# Altium PCB PCB1.PcbDoc (part 2 of 2)
Units mm, origin at the board's own origin, x right, y up, seen from the top; angles counter-clockwise.
Board outline 154.31 x 109.98 mm, 2 copper layers (Top Layer, Bottom Layer); 153 components, 126 nets, 468 pads, 76 vias.
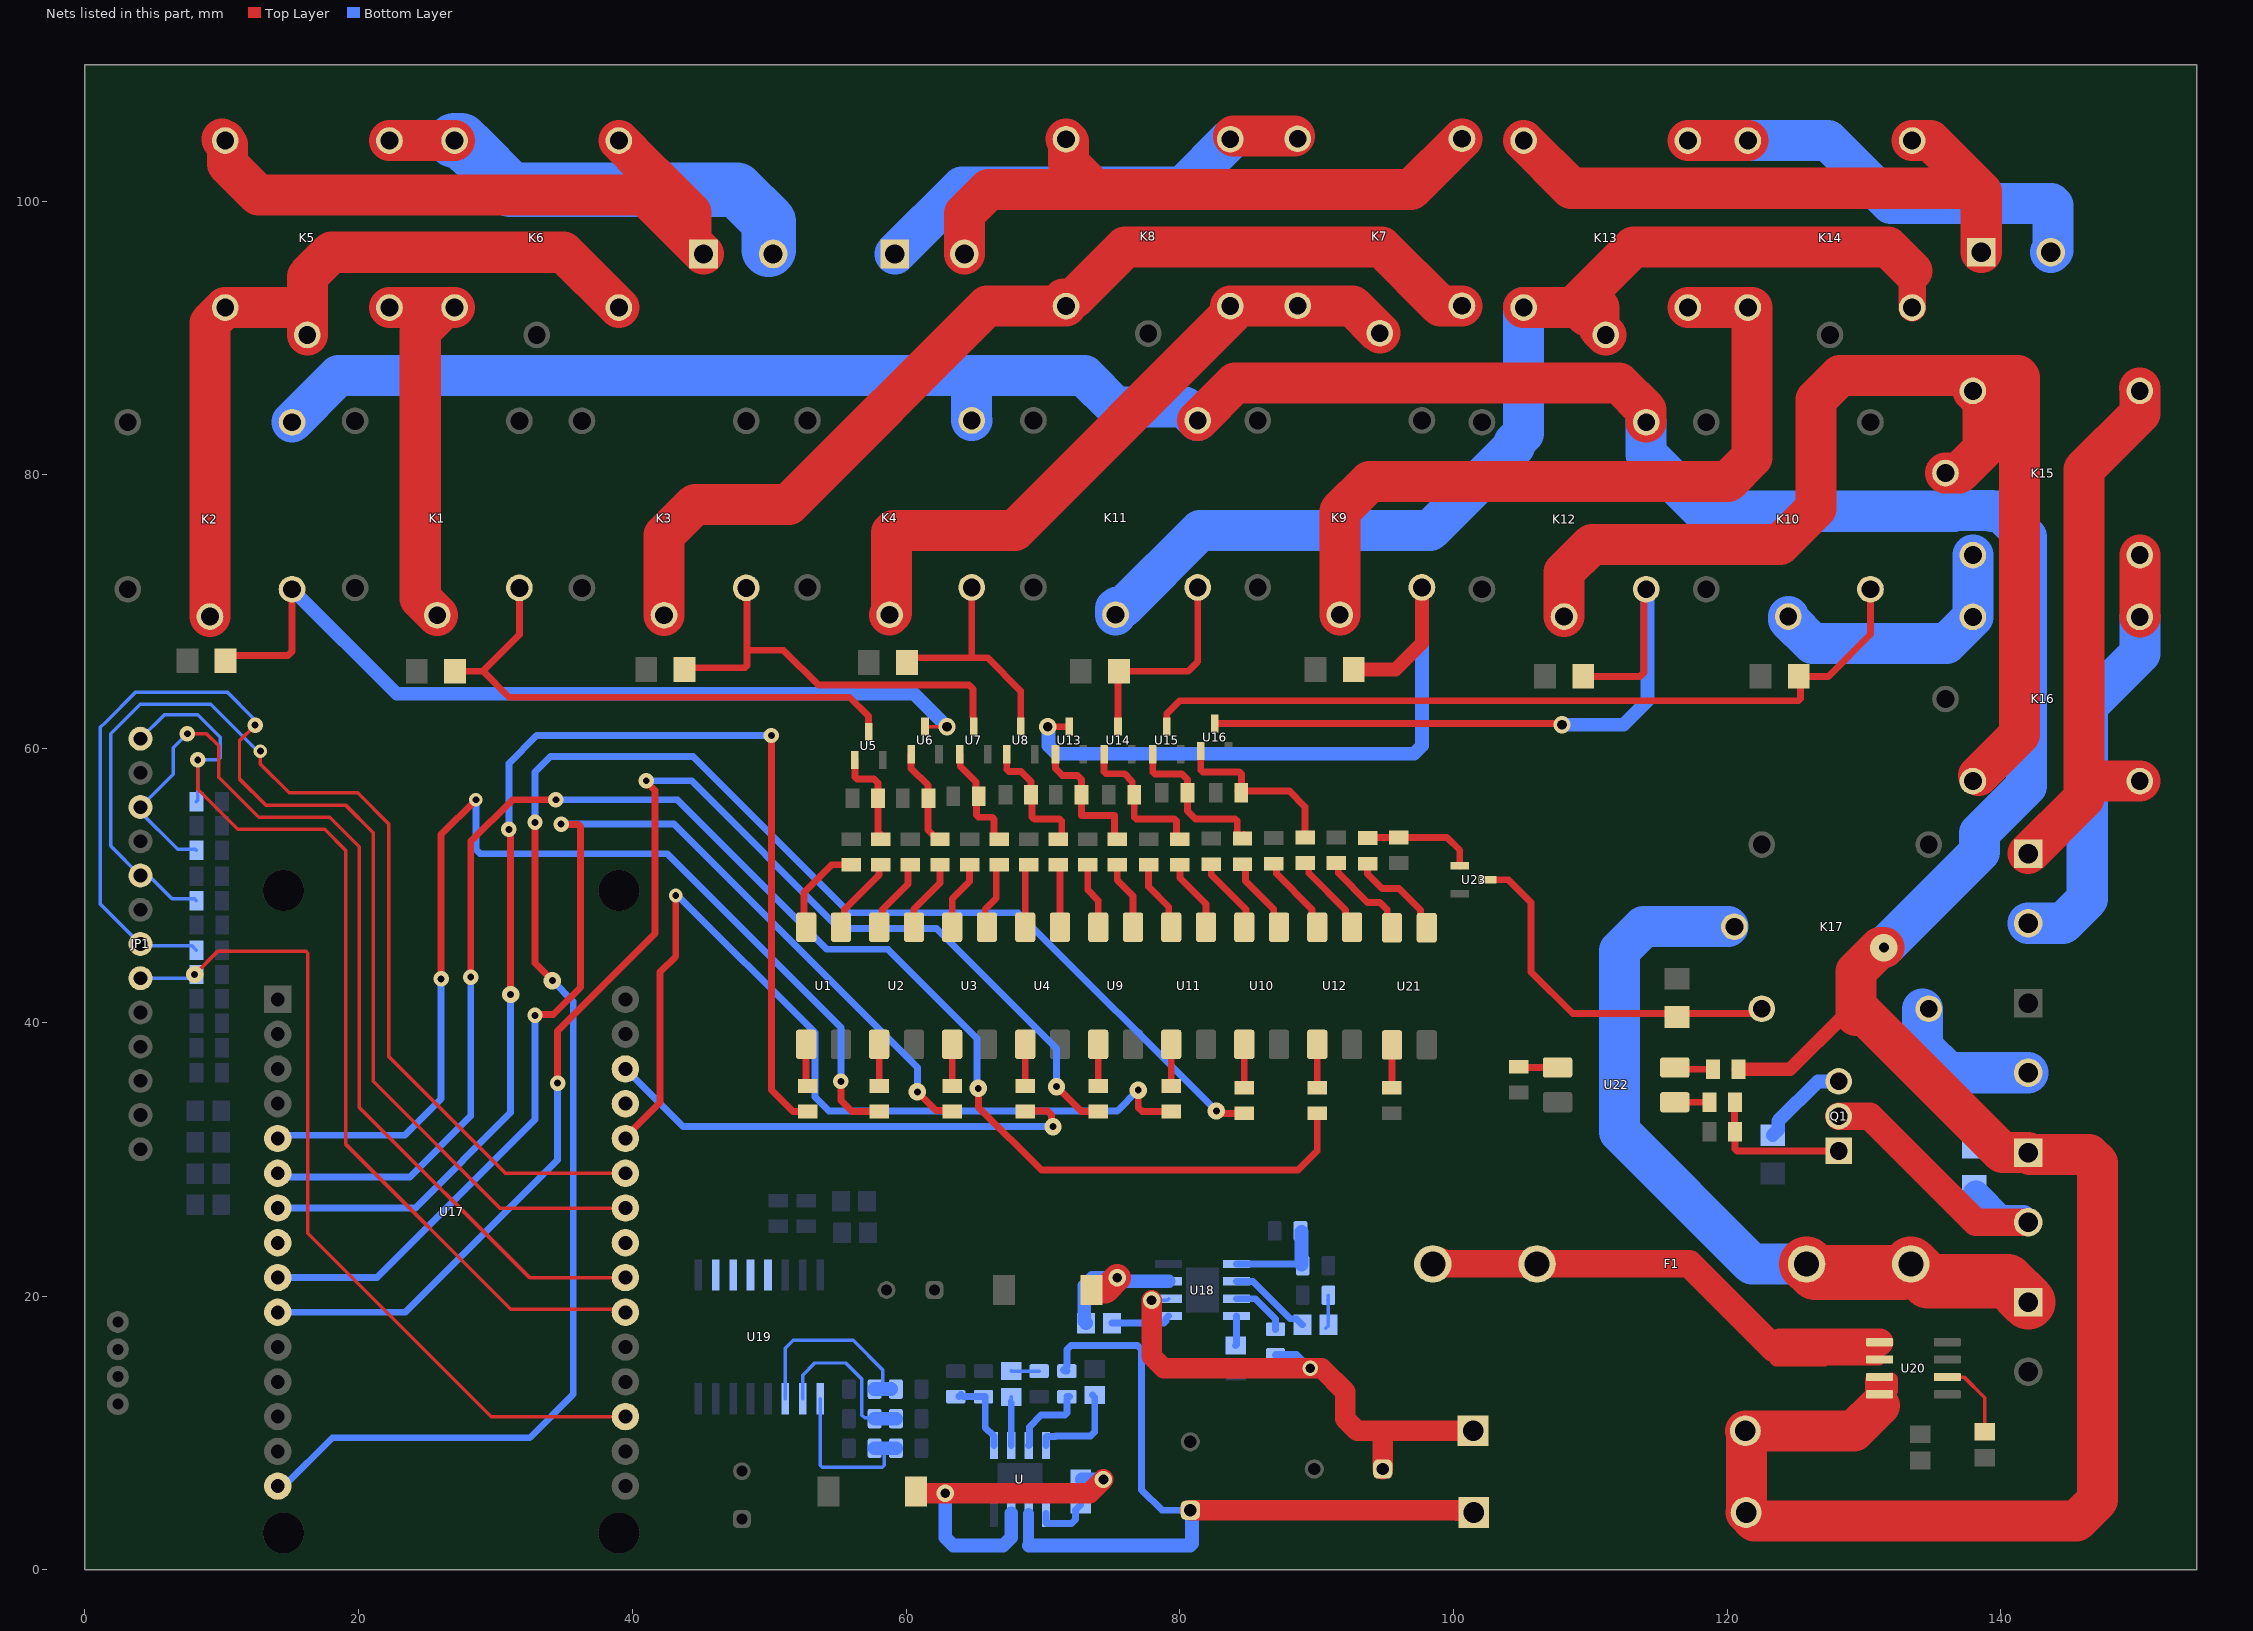
[diagram p2: the nets of this part, all layers, seen from the top]

## Via types
v1: diameter 1.127, hole 0.5, Top Layer to Bottom Layer, 26 vias
v2: diameter 1.27, hole 0.711, Top Layer to Bottom Layer, 22 vias
v3: diameter 1.27, hole 0.5, Top Layer to Bottom Layer, 10 vias
v4: diameter 1.127, hole 0.711, Top Layer to Bottom Layer, 7 vias
v5: diameter 1, hole 0.5, Top Layer to Bottom Layer, 6 vias
v6: diameter 5.711, hole 5.711, Top Layer to Bottom Layer, 4 vias
v7: diameter 2, hole 0.711, Top Layer to Bottom Layer, 1 vias

## Nets (pads, with @x,y where several pads share a name; then routed paths per layer and width w, separated by ;. In a path a pad name is that pad's centre, name@x,y a point inside that pad or via, vN(x,y) a via of type N, cw(c..) or ccw(c..) an arc to the next point about the centre after c; other vN are vias at no path point) (continued)
leftButtonPin4: JP1.6 R40.1 U17.18 | length 63.4
  Top Layer w0.254: JP1.6@4.064,42.926 JP1.6@4.064,43.227 4.492,43.227 JP1.6@4.572,43.307 ; v3(8.02,43.496) 9.736,45.212 16.143,45.212 16.292,45.063 16.292,24.602 29.697,11.197 39.137,11.197 39.243,11.303 39.349,11.197 U17.18@39.497,11.197
  Bottom Layer w0.254: JP1.6@4.064,43.227 7.886,43.227 R40.1@8.155,43.496
Net_2: ?.2 R46.2 U18.5 | length 7.3
  Bottom Layer w0.254: ?.2@88.819,24.765 ?.2@88.9,24.684 ; R46.2@88.9,22.306 R46.2@88.981,22.225
  Bottom Layer w0.5: U18.5@84.136,22.352 R46.2@88.789,22.352
  Bottom Layer w1: R46.2@88.9,22.306 ?.2@88.9,24.684
NetC1_1: C1.1 D1.C R45.2 U18.2 | length 38
  Top Layer w1.5: v2(77.944,19.693) 77.944,15.611 78.823,14.732 90.372,14.732 92.075,13.029 92.075,11.039 92.954,10.16 94.829,10.16 ; C1.1@94.829,7.366 94.829,10.16 ; D1.C@101.429,10.16 94.829,10.16
  Bottom Layer w0.254: v2(77.944,19.693) 79.067,19.693 U18.2@79.186,19.812
  Bottom Layer w0.5: R45.2@86.995,15.702 87.018,15.725 88.542,15.725 v4(89.535,14.732)
NetC2_1: C2.1 D2.C R47.2 U.2 | length 59.9
  Top Layer w1.5: C2.1@80.772,4.358 100.219,4.358 100.265,4.312 101.098,4.312 101.429,3.981 D2.C@101.429,3.81
  Bottom Layer w0.5: R47.2@71.755,14.524 71.582,14.524 71.501,14.605 71.587,14.691 71.755,14.859 71.755,16.09 72.048,16.383 76.923,16.383 77.216,16.09 77.216,5.842 78.7,4.358 C2.1@80.772,4.358
  Bottom Layer w0.8: 68.961,1.778 U.2@68.961,4.129
  Bottom Layer w1: 68.961,1.778 80.75,1.778 80.899,1.927 80.899,3.937 81.046,4.084 C2.1@80.772,4.358
NetC3_1: C3.1 L1.1 U18.3 | length 10.9
  Top Layer w2: L1.1@74.108,20.447 74.549,20.447 v2(75.438,21.336)
  Bottom Layer w1: C3.1@73.152,18.034 73.025,18.161 73.025,20.75 73.611,21.336 v2(75.438,21.336) ; v2@75.511,21.336 75.765,21.082 U18.3@79.186,21.082
NetC3_2: C3.2 U18.1 | length 4.5
  Bottom Layer w0.5: C3.2@75.052,18.034 78.845,18.034 78.994,18.183 78.994,18.369 79.167,18.542 U18.1@79.186,18.542
NetC4_1: C4.1 U18.8 | length 2.2
  Bottom Layer w0.5: C4.1@84.074,16.383 84.136,16.445 84.136,17.718 U18.8@84.136,18.542
NetC6_1: C6.1 U18.6 | length 6.1
  Bottom Layer w0.5: U18.6@84.136,21.082 84.145,21.073 85.353,21.073 88.084,18.342 88.531,18.342 C6.1@88.966,17.907
NetC6_2: C6.2 R49.2 | length 2.5
  Bottom Layer w0.254: C6.2@90.678,17.653 90.866,17.841 C6.2@90.866,17.907 90.851,17.922 90.851,19.639 90.805,19.685 90.851,19.731 R49.2@90.851,20.066
NetC7_1: C7.1 L2.1 U.3 | length 26
  Top Layer w1.5: L2.1@60.858,5.588 73.406,5.588 v2(74.422,6.604)
  Bottom Layer w0.254: C7.1@72.771,6.665 C7.1@72.832,6.604
  Bottom Layer w1: v2(62.865,5.588) 62.865,2.364 63.451,1.778 67.105,1.778 67.691,2.364 U.3@67.691,4.129 ; C7.1@72.832,6.604 v2(74.422,6.604)
NetC7_2: C7.2 U.1 | length 4.2
  Bottom Layer w0.5: U.1@70.231,4.129 70.231,3.444 70.281,3.394 72.096,3.394 72.388,3.687 72.388,4.382 C7.2@72.771,4.765
NetC8_1: C8.1 U.8 | length 7.1
  Bottom Layer w0.5: U.8@70.231,9.079 70.231,9.702 70.281,9.752 70.904,9.752 70.931,9.779 73.494,9.779 73.787,10.072 73.787,12.612 C8.1@73.633,12.766
NetC10_1: C10.1 U.6 | length 3.7
  Bottom Layer w0.254: C10.1@67.691,12.192 67.564,12.319 67.691,12.446 C10.1@67.691,12.639
  Bottom Layer w0.5: U.6@67.691,9.079 C10.1@67.691,12.192
NetC10_2: C10.2 R51.2 | length 2
  Bottom Layer w0.254: C10.2@67.691,14.539 67.706,14.524 R51.2@69.723,14.524
NetC12_1: C12.1 U20.6 | length 5.8
  Top Layer w0.254: U20.6@136.079,14.097 136.088,14.088 137.296,14.088 138.811,12.573 C12.1@138.811,10.094
NetJ1_1: J1.1 K1.A2 U5.3 | length 39.9
  Top Layer w0.5: J1.1@27.054,65.659 29.083,65.659 ; K1.A2@31.75,71.747 31.75,68.326 29.083,65.659 ; U5.3@57.248,61.243 57.248,62.386 55.88,63.754 30.988,63.754 29.083,65.659
NetJ2_1: J2.1 K2.A2 U6.3 | length 63.6
  Top Layer w0.254: U6.3@61.392,61.622 61.418,61.595 62.523,61.595 62.611,61.683 62.611,61.849 62.865,61.595 v2(62.992,61.595)
  Top Layer w0.5: J2.1@10.29,66.421 10.671,66.802 14.851,66.802 15.144,67.095 K2.A2@15.144,71.651
  Bottom Layer w1: K2.A2@15.144,71.651 22.787,64.008 60.579,64.008 v2(62.992,61.595)
NetJ3_1: J3.1 K3.A2 U7.3 | length 30.1
  Top Layer w0.5: J3.1@43.818,65.786 44.196,65.786 44.323,65.913 48.238,65.913 48.387,66.062 48.387,67.183 ; K3.A2@48.322,71.747 48.387,71.682 48.387,67.183 ; 64.897,62.325 64.897,64.35 64.604,64.643 53.594,64.643 51.054,67.183 48.387,67.183
NetJ4_1: J4.1 K4.A2 U8.3 | length 17.3
  Top Layer w0.5: J4.1@60.074,66.294 60.424,66.644 64.801,66.644 ; K4.A2@64.801,71.778 64.874,71.778 64.897,71.755 64.801,71.659 64.801,66.644 ; U8.3@68.377,61.622 68.377,64.223 65.956,66.644 64.801,66.644
NetJ5_1: J5.1 K5.NC K6.NO | length 49.2
  Top Layer w3: K5.NC@10.033,104.521 K5.NC@10.129,104.425 ; K5.NC@10.256,104.425 K5.NC@10.129,104.425 ; K6.NO@39.02,104.425 40.941,102.504 41.941,101.504 44.292,99.153 J5.1@44.292,97.059 ; J5.1@45.212,96.139 J5.1@44.292,97.059 ; K5.NC@10.129,104.425 10.414,104.14 10.414,102.722 12.679,100.457 40.894,100.457 43.245,98.106 J5.1@44.292,97.059
NetJ5_2: J5.2 K5.NO K6.NC | length 32.2
  Top Layer w3: K5.NO@22.256,104.425 K6.NC@27.02,104.425
  Bottom Layer w4: K6.NC@27.02,104.425 27.479,104.425 28.018,103.886 28.067,103.886 31.115,100.838 47.635,100.838 49.979,98.495 J5.2@49.979,96.452
NetJ6_1: J6.1 K7.NC K8.NO | length 33.1
  Top Layer w0.254: K8.NO@83.693,104.529 K8.NO@83.939,104.775 ; K7.NC@88.392,104.775 K7.NC@88.615,104.552
  Top Layer w3: K8.NO@83.939,104.775 K7.NC@88.392,104.775
  Bottom Layer w3: J6.1@59.182,96.139 64.087,101.044 80.208,101.044 K8.NO@83.693,104.529
NetJ6_2: J6.2 K7.NO K8.NC | length 46.1
  Top Layer w3: J6.2@64.262,96.139 64.262,99.081 66.019,100.838 73.809,100.838 ; K8.NC@71.693,104.529 71.882,104.34 71.882,102.765 73.809,100.838 ; K7.NO@100.615,104.552 96.901,100.838 73.809,100.838
NetJ7_1: J7.1 K9.A2 U13.3 | length 52.2
  Top Layer w0.5: v2(70.358,61.595) 71.906,61.595 U13.3@71.933,61.622
  Top Layer w1: J7.1@92.713,65.786 95.758,65.786 97.694,67.722 K9.A2@97.694,71.778
  Bottom Layer w1: v2(70.358,61.595) 70.41,61.543 70.41,60.213 70.995,59.628 97.108,59.628 97.694,60.213 K9.A2@97.694,71.778
NetJ8_1: J8.1 K11.A2 U14.3 | length 15.8
  Top Layer w0.5: U14.3@75.489,61.622 75.489,64.886 76.008,65.405 76.073,65.405 76.076,65.408 J8.1@76.076,65.659 ; J8.1@75.568,65.659 J8.1@76.076,65.659 ; K11.A2@81.311,71.778 81.311,66.347 80.623,65.659 J8.1@76.076,65.659
NetJ9_1: J9.1 K10.A2 U15.3 | length 59
  Top Layer w0.5: U15.3@79.045,61.622 79.045,62.535 80.01,63.5 125.2,63.5 125.349,63.649 125.349,65.154 J9.1@125.225,65.278 ; J9.1@125.349,65.278 127.381,65.278 130.46,68.357 K10.A2@130.46,71.651
NetJ10_1: J10.1 K12.A2 U16.3 | length 51.3
  Top Layer w0.254: v2@107.828,61.849 v2(107.926,61.751)
  Top Layer w0.5: U16.3@82.55,61.849 v2@107.828,61.849 ; J10.1@109.477,65.278 113.626,65.278 113.919,65.571 113.919,71.493 K12.A2@114.077,71.651
  Bottom Layer w1: v2(107.926,61.751) 112.424,61.751 114.173,63.5 114.173,71.555 K12.A2@114.077,71.651
NetJ11_1: J11.1 K13.NC K14.NO | length 45.4
  Top Layer w3: K13.NC@105.125,104.425 108.605,100.945 138.323,100.945 134.843,104.425 K14.NO@133.508,104.425 ; 138.535,100.733 138.557,100.711 J11.1@138.557,96.266
NetJ11_2: J11.2 K13.NO K14.NC | length 32.1
  Top Layer w3: K13.NO@117.125,104.425 K14.NC@121.508,104.425
  Bottom Layer w3: K14.NC@121.508,104.425 127.35,104.425 131.953,99.822 143.637,99.822 143.786,99.673 143.786,96.415 J11.2@143.637,96.266
NetJ12_1: J12.1 K15.NC K16.NO | length 41.1
  Top Layer w3: J12.1@141.986,52.324 145.838,56.176 ; 146.05,56.388 146.05,80.391 150.145,84.486 K15.NC@150.145,86.137 150.145,86.329 K15.NC@150.114,86.36 ; 146.35,58.12 146.843,57.627 K16.NO@150.145,57.627
NetJ12_2: J12.2 K15.NO K16.NC | length 31.8
  Top Layer w3: K16.NC@150.145,69.627 K15.NO@150.145,74.137
  Bottom Layer w3: J12.2@141.986,47.244 144.547,47.244 146.304,49.001 146.304,63.119 150.145,66.96 K16.NC@150.145,69.627
NetJ13_2: J13.2 Q1.3 | length 6.8
  Bottom Layer w1: J13.2@123.317,31.753 123.717,32.153 123.717,32.785 126.619,35.687 Q1.3@128.143,35.687
NetJ14_1: J14.1 K17.A2 U23.3 | length 27.3
  Top Layer w0.5: U23.3@102.489,50.419 104.013,50.419 105.664,48.768 105.664,43.688 108.712,40.64 J14.1@116.332,40.64 ; J14.1@116.332,40.386 116.586,40.64 121.781,40.64 122.131,40.99 K17.A2@122.523,40.99
NetJ15_1: J15.1 J16.2 Q1.2 | length 21.7
  Top Layer w2: Q1.2@128.143,33.147 130.4,33.147 138.147,25.4 J16.2@141.986,25.4
  Bottom Layer w2: J15.1@138.176,27.432 139.954,25.654 141.605,25.654 141.84,25.419 141.967,25.419 J16.2@141.986,25.4
NetJ17_2: J17.2 K17.NO | length 11.3
  Bottom Layer w3: K17.NO@134.27,40.99 134.27,38.196 136.144,36.322 J17.2@141.986,36.322
NetK1_COM: K1.COM K5.A2 K6.A1 | length 29.2
  Top Layer w3: K5.A2@22.256,92.225 25.723,92.225 K6.A1@27.02,92.225 26.268,92.225 24.511,90.468 24.511,70.986 K1.COM@25.75,69.747
NetK2_COM: K2.COM K5.A1 K5.COM K6.A2 | length 58.5
  Top Layer w3: K2.COM@9.144,69.651 9.144,91.113 K5.A1@10.256,92.225 16.256,92.225 ; K5.COM@16.256,90.225 16.256,92.225 ; K6.A2@39.02,92.225 34.979,96.266 18.013,96.266 16.256,94.509 16.256,92.225
NetK3_COM: K3.COM K7.A2 K8.A1 | length 75.2
  Top Layer w3: K3.COM@42.322,69.747 42.322,75.596 44.577,77.851 51.435,77.851 65.913,92.329 K8.A1@71.693,92.329 71.501,92.521 71.501,92.837 72.201,92.837 76.011,96.647 94.742,96.647 99.037,92.352 K7.A2@100.615,92.352
NetK4_COM: K4.COM K7.A1 K7.COM K8.A2 | length 49.8
  Top Layer w3: K4.COM@58.801,69.778 58.928,69.905 58.928,75.797 59.077,75.946 67.945,75.946 83.693,91.694 K8.A2@83.693,92.329 88.592,92.329 K7.A1@88.615,92.352 92.615,92.352 K7.COM@94.615,90.352
NetK9_COM: K9.COM K13.A2 K14.A1 | length 54.6
  Top Layer w3: K9.COM@91.694,69.778 91.694,77.343 93.853,79.502 120.036,79.502 121.793,81.259 K14.A1@121.793,92.225 ; K13.A2@117.125,92.225 K14.A1@121.508,92.225
NetK10_COM: K10.COM K15.A2 K16.A1 | length 19.7
  Bottom Layer w3: K10.COM@124.46,69.651 124.46,69.448 126.217,67.691 136.009,67.691 K16.A1@137.945,69.627 K15.A2@137.945,74.137
NetK11_COM: K11.COM K13.A1 K13.COM K14.A2 | length 82
  Top Layer w2: K14.A2@133.508,92.225 133.508,94.89
  Top Layer w3: K13.A1@105.125,92.225 109.125,92.225 109.756,91.595 ; 108.735,92.225 113.157,96.647 131.751,96.647 133.508,94.89 ; 110.617,92.225 110.617,90.733 K13.COM@111.125,90.225
  Bottom Layer w3: K11.COM@75.311,69.778 75.311,70.231 75.438,70.358 75.464,70.332 75.865,70.332 81.479,75.946 98.298,75.946 104.439,82.087 104.439,82.354 105.125,83.04 K13.A1@105.125,92.225
NetK12_COM: K12.COM K15.A1 K15.COM K16.A2 | length 86.2
  Top Layer w0.254: K16.A2@137.945,57.627 137.945,57.808 138.176,58.039 K16.A2@138.357,58.039 ; 141.224,87.249 141.351,87.122
  Top Layer w3: K12.COM@108.077,69.651 108.077,72.898 110.109,74.93 123.846,74.93 126.479,77.563 126.479,85.492 128.236,87.249 138.049,87.249 141.224,87.249 ; K15.COM@135.945,80.137 136.945,80.137 138.702,81.894 138.702,85.38 K15.A1@137.945,86.137 ; K16.A2@138.357,58.039 141.351,61.033 141.351,87.122
NetLabel22: U17.8 | length 0.4
  Top Layer w0.254: U17.8@14.097,23.897 14.097,24.13 U17.8@14.224,24.257
NetLabel23: U17.27
NetLabel36: U17.23
NetLabel51: U19.13
NetLabel52: U19.12
NetLabel53: U19.11
NetLabel54: U19.10
NetQ1_1: Q1.1 R59.2 R61.2 | length 11.1
  Top Layer w0.5: R59.2@120.569,34.163 120.523,34.117 120.523,32.512 120.569,32.466 120.569,30.756 120.718,30.607 Q1.1@128.143,30.607
NetR1_2: R1.2 U2.1 | length 3
  Top Layer w0.5: R1.2@58.039,35.352 U2.1@58.039,38.392
NetR2_2: R2.2 U1.1 | length 3.1
  Top Layer w0.254: R2.2@52.705,35.433 52.786,35.352 R2.2@52.832,35.352
  Top Layer w0.5: R2.2@52.705,35.433 U1.1@52.705,38.392
NetR3_2: R3.2 U4.1 | length 3
  Top Layer w0.5: R3.2@68.707,35.352 U4.1@68.707,38.392
NetR4_2: R4.2 U3.1 | length 3
  Top Layer w0.5: R4.2@63.373,35.352 U3.1@63.373,38.392
NetR5_2: R5.2 R9.2 U5.1 | length 7.4
  Top Layer w0.5: U5.1@56.261,59.182 56.261,57.934 56.41,57.785 57.658,57.785 57.958,57.485 R5.2@57.958,56.388 57.958,53.759 57.996,53.721 58.166,53.721 R9.2@58.166,53.386
NetR6_1: R6.1 U1.4 | length 6.9
  Top Layer w0.5: U1.4@52.705,46.952 52.548,47.109 52.548,49.5 54.564,51.516 R6.1@56.007,51.516
NetR7_1: R7.1 U2.4 | length 5.5
  Top Layer w0.5: U2.4@58.039,46.952 58.292,47.205 58.292,48.259 60.155,50.122 60.155,51.346 R7.1@60.325,51.516
NetR8_1: R8.1 U2.3 | length 5.4
  Top Layer w0.5: U2.3@60.579,46.952 60.579,48.278 62.484,50.183 R8.1@62.484,51.516
NetR8_2: R8.2 R15.2 U6.1 | length 7.2
  Top Layer w0.5: U6.1@60.376,59.59 60.376,58.556 61.602,57.33 61.602,56.388 61.602,54.058 62.274,53.386 R8.2@62.484,53.386
NetR9_1: R9.1 U1.3 | length 5.8
  Top Layer w0.5: U1.3@55.245,46.952 55.498,47.205 55.498,48.259 58.023,50.784 58.023,51.373 R9.1@58.166,51.516
NetR10_1: R10.1 U3.4 | length 5.1
  Top Layer w0.5: U3.4@63.373,46.952 63.373,49.022 64.643,50.292 R10.1@64.643,51.516
NetR11_2: R11.2 R14.2 U7.1 | length 8.1
  Top Layer w0.5: U7.1@63.932,59.59 63.961,59.56 63.961,58.721 65.11,57.572 65.11,56.729 R11.2@65.324,56.515 65.151,56.342 65.151,55.14 65.3,54.991 66.272,54.991 66.421,54.842 66.421,53.721 66.756,53.386 R14.2@66.802,53.386
NetR12_1: R12.1 U4.4 | length 5.1
  Top Layer w0.254: R12.1@68.707,51.143 68.999,51.435 69.215,51.435 69.134,51.516 R12.1@68.961,51.516
  Top Layer w0.5: U4.4@68.707,46.952 R12.1@68.707,51.143
NetR13_1: R13.1 U4.3 | length 4.8
  Top Layer w0.5: R13.1@71.12,51.516 71.247,51.389 71.247,47.752 71.501,47.498 71.247,47.244 U4.3@71.247,46.952
NetR13_2: R13.2 R16.2 U8.1 | length 10
  Top Layer w0.5: U8.1@67.361,59.59 67.361,58.471 67.51,58.322 68.4,58.322 69.134,57.588 R16.2@69.134,56.642 69.215,56.561 69.215,55.013 69.364,54.864 71.225,54.864 71.374,54.715 71.374,53.213 71.201,53.386 R13.2@71.12,53.386
NetR14_1: R14.1 U3.3 | length 5
  Top Layer w0.5: U3.3@65.913,46.952 65.786,47.079 65.786,48.26 66.592,49.066 66.592,51.306 R14.1@66.802,51.516
NetR17_2: R17.2 U11.1 | length 3.2
  Top Layer w0.254: R17.2@79.375,35.687 79.629,35.433 R17.2@79.548,35.352
  Top Layer w0.5: R17.2@79.375,35.687 U11.1@79.375,38.392
NetR18_2: R18.2 U12.1 | length 3.2
  Top Layer w0.5: R18.2@90.043,35.225 U12.1@90.043,38.392
NetR19_2: R19.2 U9.1 | length 3.4
  Top Layer w0.254: U9.1@74.041,38.1 73.787,38.354 73.825,38.392 U9.1@74.041,38.392
  Top Layer w0.5: R19.2@74.041,35.352 U9.1@74.041,38.1
NetR20_2: R20.2 U10.1 | length 3.2
  Top Layer w0.5: R20.2@84.709,35.225 U10.1@84.709,38.392
NetR21_2: R21.2 R29.2 U13.1 | length 10.1
  Top Layer w0.5: U13.1@70.917,59.59 70.917,58.542 71.42,58.039 72.517,58.039 72.817,57.739 72.817,55.118 75.228,55.118 75.228,53.596 R29.2@75.438,53.386
NetR22_2: R22.2 R30.2 U15.1 | length 12.3
  Top Layer w0.5: U15.1@78.029,59.59 78.029,58.289 78.178,58.14 80.163,58.14 80.564,57.739 80.564,55.453 81.153,54.864 84.052,54.864 84.201,54.715 84.201,53.467 84.236,53.432 R30.2@84.582,53.432 84.582,53.594 R30.2@84.709,53.721
NetR23_1: R23.1 U9.4 | length 5
  Top Layer w0.5: R23.1@73.279,51.516 73.279,49.657 74.041,48.895 74.041,47.498 74.168,47.371 74.041,47.244 U9.4@74.041,46.952
NetR24_1: R24.1 U10.4 | length 5.7
  Top Layer w0.5: R24.1@82.296,51.562 82.296,50.8 84.837,48.259 84.837,47.08 U10.4@84.709,46.952
NetR25_1: R25.1 U11.4 | length 5.2
  Top Layer w0.5: R25.1@77.724,51.516 77.724,49.911 79.195,48.44 79.195,47.132 U11.4@79.375,46.952
NetR26_1: R26.1 U11.3 | length 5.4
  Top Layer w0.5: R26.1@80.01,51.516 80.01,50.546 81.915,48.641 U11.3@81.915,46.952
NetR26_2: R26.2 R31.2 U14.1 | length 10.9
  Top Layer w0.5: U14.1@74.473,59.59 74.473,58.315 74.622,58.166 75.946,58.166 76.528,57.584 76.528,56.787 R31.2@76.673,56.642 76.673,55.013 76.822,54.864 79.607,54.864 79.756,54.715 79.756,53.64 R26.2@80.01,53.386
NetR27_1: R27.1 U12.4 | length 6
  Top Layer w0.5: R27.1@86.868,51.597 87.057,51.408 87.057,50.865 89.663,48.259 89.663,47.332 U12.4@90.043,46.952
NetR28_1: R28.1 U12.3 | length 6.1
  Top Layer w0.5: R28.1@89.154,51.643 89.424,51.373 89.424,50.911 92.114,48.221 92.114,47.421 U12.3@92.583,46.952
NetR28_2: R28.2 R32.2 U16.1 | length 13.5
  Top Layer w0.5: U16.1@81.534,59.817 81.534,58.442 81.683,58.293 84.352,58.293 84.501,58.144 R32.2@84.501,56.896 ; R32.2@84.252,56.896 84.379,56.769 R32.2@84.501,56.769 R32.2@84.501,56.896 ; R28.2@89.154,53.513 89.154,55.753 88.011,56.896 R32.2@84.501,56.896
NetR29_1: R29.1 U9.3 | length 5
  Top Layer w0.5: R29.1@75.438,51.516 75.438,50.382 76.581,49.239 U9.3@76.581,46.952
NetR30_1: R30.1 U10.3 | length 5.7
  Top Layer w0.5: R30.1@84.582,51.562 84.792,51.352 84.792,50.336 86.869,48.259 86.869,47.332 U10.3@87.249,46.952
NetR45_1: R45.1 U18.7 | length 4.2
  Bottom Layer w0.5: U18.7@84.136,19.812 85.51,19.812 86.995,18.327 R45.1@86.995,17.572
NetR47_1: R47.1 U.7 | length 6
  Bottom Layer w0.5: U.7@68.961,9.079 69.014,9.132 69.014,10.445 69.872,11.303 71.606,11.303 71.755,11.452 71.755,12.446 71.963,12.654 R47.1@71.755,12.654
NetR48_2: R48.2 R50.2 U.5 | length 5.9
  Bottom Layer w0.5: R48.2@63.881,12.654 63.881,12.7 64.008,12.827 64.181,12.654 65.786,12.654 65.786,10.399 66.421,9.764 U.5@66.421,9.079
NetR54_2: R54.2 U21.1 | length 3.2
  Top Layer w0.254: R54.2@95.504,35.352 R54.2@95.631,35.225
  Top Layer w0.5: R54.2@95.504,35.352 U21.1@95.504,38.354
NetR55_2: R55.2 U22.1 | length 2.9
  Top Layer w0.254: R55.2@104.521,36.703 104.567,36.749 R55.2@104.775,36.749 ; R55.2@105.156,36.495 R55.2@105.156,36.703
  Top Layer w0.5: R55.2@105.156,36.703 U22.1@107.607,36.703
NetR56_1: R56.1 U21.4 | length 6.9
  Top Layer w0.5: R56.1@91.44,51.643 91.583,51.5 91.583,50.911 93.726,48.768 94.615,48.768 95.162,48.221 95.162,47.256 U21.4@95.504,46.914
NetR57_1: R57.1 U21.3 | length 7.2
  Top Layer w0.5: R57.1@93.726,51.597 93.726,50.847 94.789,49.784 96.012,49.784 97.594,48.202 97.594,47.364 U21.3@98.044,46.914
NetR57_2: R57.2 R60.2 U23.1 | length 8.3
  Top Layer w0.5: R57.2@93.726,53.467 93.772,53.513 R60.2@96.012,53.513 99.522,53.513 100.457,52.578 U23.1@100.457,51.435
NetR58_1: R58.1 U22.4 | length 2.8
  Top Layer w0.254: U22.4@116.167,36.703 U22.4@116.294,36.576
  Top Layer w0.5: U22.4@116.294,36.576 R58.1@118.953,36.576
NetR59_1: R59.1 U22.3 | length 2.5
  Top Layer w0.5: U22.3@116.167,34.163 R59.1@118.699,34.163
NetR62_1: R62.1 R63.2 U19.1 | length 12.5
  Bottom Layer w0.254: U19.1@53.721,12.497 53.721,7.642 53.87,7.493 58.271,7.493 58.42,7.642 58.42,8.763 58.547,8.89
  Bottom Layer w1: R63.2@57.704,8.89 58.547,8.89 R62.1@59.263,8.89
NetR64_1: R64.1 R65.2 U19.2 | length 12.1
  Bottom Layer w0.254: U19.2@52.451,12.497 52.451,14.224 53.34,15.113 55.605,15.113 56.769,13.949 56.769,11.303 56.972,11.1 57.653,11.1 R65.2@57.704,11.049
  Bottom Layer w1: R65.2@57.704,11.049 R64.1@59.263,11.049
NetR66_1: R66.1 R67.2 U19.3 | length 15.2
  Bottom Layer w0.254: U19.3@51.181,12.497 51.181,16.189 51.756,16.764 56.134,16.764 58.293,14.605 58.293,13.208 ; R67.2@57.704,13.035 R67.2@57.704,13.208 ; R66.1@58.928,13.208 59.055,13.081 59.182,13.208 R66.1@59.263,13.208
  Bottom Layer w1: R67.2@57.704,13.208 58.293,13.208 R66.1@58.928,13.208
rightButtonPin1: JP1.13 R33.1 U17.21 | length 75.9
  Top Layer w0.254: JP1.13@3.937,60.452 4.064,60.579 JP1.13@4.064,60.727 JP1.13@4.244,60.727 ; v1(8.255,59.182) 8.255,57.023 11.176,54.102 17.526,54.102 19.05,52.578 19.05,31.115 31.115,19.05 39.264,19.05 U17.21@39.497,18.817
  Bottom Layer w0.254: JP1.13@4.064,60.727 5.821,62.484 8.255,62.484 9.906,60.833 9.906,59.331 9.757,59.182 v1(8.255,59.182) 8.255,56.234 R33.1@8.155,56.134
rightButtonPin2: JP1.11 R35.1 U17.22 | length 73.8
  Top Layer w0.254: JP1.11@4.064,56.007 JP1.11@4.064,55.727 4.09,55.727 JP1.11@4.204,55.613 ; v1(7.493,61.087) 8.89,61.087 9.779,60.198 9.779,57.912 12.7,54.991 17.907,54.991 20.066,52.832 20.066,33.782 32.491,21.357 U17.22@39.497,21.357
  Bottom Layer w0.254: v1(7.493,61.087) 6.477,60.071 6.477,58.14 JP1.11@4.064,55.727 4.064,55.372 6.788,52.648 8.085,52.648 R35.1@8.155,52.578
rightButtonPin3: JP1.9 R37.1 U17.25 | length 79.4
  Top Layer w0.254: JP1.9@4.064,50.727 4.245,50.727 JP1.9@4.445,50.927 ; v5(12.827,59.817) 12.827,58.876 14.934,56.769 19.939,56.769 22.225,54.483 22.225,37.487 30.735,28.977 U17.25@39.497,28.977
  Bottom Layer w0.254: JP1.9@4.064,50.727 1.905,52.886 1.905,61.087 4.064,63.246 9.196,63.246 12.625,59.817 v5(12.827,59.817) ; JP1.9@4.35,50.441 4.961,50.441 6.372,49.03 8.02,49.03 R37.1@8.155,48.895
rightButtonPin4: JP1.7 R39.1 U17.24 | length 91.8
  Top Layer w0.254: JP1.7@4.064,45.727 4.071,45.727 JP1.7@4.258,45.914 ; v1(12.446,61.722) 11.303,60.579 11.303,57.785 13.208,55.88 19.05,55.88 21.082,53.848 21.082,35.687 30.332,26.437 U17.24@39.497,26.437
  Bottom Layer w0.254: R39.1@8.155,45.274 7.836,45.593 4.755,45.593 4.445,45.903 4.445,46.101 4.071,45.727 JP1.7@4.064,45.727 1.143,48.648 1.143,61.551 1.524,61.932 3.727,64.135 10.414,64.135 12.279,62.27 12.279,61.889 v1(12.446,61.722)
stopRelayPin1: R1.1 U17.5 | length 80.2
  Top Layer w0.5: v1(26.035,43.18) 26.035,53.721 v5(28.575,56.261) ; v1(55.245,35.687) 55.245,34.29 56.053,33.482 R1.1@58.039,33.482
  Bottom Layer w0.5: U17.5@14.097,31.517 14.33,31.75 23.368,31.75 26.035,34.417 v1(26.035,43.18) ; v5(28.575,56.261) 28.575,52.617 28.868,52.324 42.545,52.324 55.245,39.624 v1(55.245,35.687)
stopRelayPin2: R3.1 U17.28 | length 36
  Top Layer w0.254: R3.1@68.661,33.528 R3.1@68.707,33.482
  Top Layer w0.5: R3.1@68.661,33.528 70.338,33.528 70.63,33.235 70.63,32.494 v3(70.739,32.385)
  Bottom Layer w0.5: U17.28@39.497,36.597 43.709,32.385 v3(70.739,32.385)
stopRelayPin3: R17.1 U17.26 | length 66.8
  Top Layer w0.5: U17.26@39.497,31.517 39.497,31.623 42.037,34.163 42.037,43.688 43.18,44.831 v5(43.18,49.276) ; v3(76.962,35.052) 76.962,33.782 77.262,33.482 R17.1@79.375,33.482
  Bottom Layer w0.5: v5(43.18,49.276) 43.307,49.276 53.34,39.243 53.34,34.544 54.356,33.528 75.438,33.528 v3(76.962,35.052)
stopRelayPin4: R18.1 U17.6 | length 116.8
  Top Layer w0.5: v1(28.194,43.307) 28.194,53.213 31.242,56.261 v1(34.417,56.261) ; v3(65.278,35.179) 65.306,35.151 65.306,33.794 69.89,29.21 88.646,29.21 90.043,30.607 90.043,33.274 89.962,33.355 R18.1@90.043,33.355
  Bottom Layer w0.5: U17.6@14.097,28.977 14.372,28.702 23.749,28.702 28.194,33.147 v1(28.194,43.307) ; v1(34.417,56.261) 43.307,56.261 54.229,45.339 58.674,45.339 65.195,38.818 65.195,35.262 v3(65.278,35.179)
transistorPin1: R2.1 U17.7 | length 94.7
  Top Layer w0.254: v1(30.988,54.102) v1@31.115,53.975
  Top Layer w0.5: v3(31.115,42.037) v1@31.115,53.975 ; v1(50.165,60.96) 50.165,35.052 51.735,33.482 R2.1@52.832,33.482
  Bottom Layer w0.5: U17.7@14.097,26.437 24.151,26.437 31.115,33.401 v3(31.115,42.037) ; v1(30.988,54.102) 30.988,58.928 33.02,60.96 v1(50.165,60.96)
transistorPin2: R4.1 U17.9 | length 86.7
  Top Layer w0.5: v1(32.893,40.513) 32.956,40.576 34.227,40.576 36.215,42.565 36.215,54.314 36.066,54.463 34.818,54.463 v1(34.798,54.483) ; v3@60.98,34.778 62.206,33.552 63.303,33.552 R4.1@63.373,33.482
  Bottom Layer w0.5: U17.9@14.097,21.357 21.357,21.357 32.893,32.893 v1(32.893,40.513) ; v1(34.798,54.483) 43.053,54.483 60.833,36.703 v3(60.833,34.925)
transistorPin3: R19.1 U17.10 | length 101.3
  Top Layer w0.254: U17.10@13.843,18.542 14.097,18.796 U17.10@14.097,18.817 14.203,18.817 U17.10@14.351,18.669
  Top Layer w0.5: v1(34.544,35.56) 34.544,39.37 41.656,46.482 41.656,56.957 41.021,57.592 v1(41.021,57.658) ; v3(70.993,35.306) 72.817,33.482 R19.1@74.041,33.482
  Bottom Layer w0.5: U17.10@14.097,18.817 23.403,18.817 34.544,29.958 v1(34.544,35.56) ; v1(41.021,57.658) 44.323,57.658 55.118,46.863 62.23,46.863 70.993,38.1 v3(70.993,35.306)
transistorPin4: R20.1 U17.15 | length 134.1
  Top Layer w0.254: v3(82.677,33.528) v3@82.871,33.334 ; R20.1@84.268,33.334 84.247,33.355 R20.1@84.709,33.355
  Top Layer w0.5: v1(32.893,54.61) 32.893,44.323 v3(34.163,43.053) ; v3@82.871,33.334 R20.1@84.268,33.334
  Bottom Layer w0.5: U17.15@14.097,6.117 14.569,6.117 18.104,9.652 32.512,9.652 35.687,12.827 35.687,41.529 v3(34.163,43.053) ; v1(32.893,54.61) 32.893,58.293 34.036,59.436 44.45,59.436 55.88,48.006 68.199,48.006 v3(82.677,33.528)
VCC: D1.A D2.A J15.2 J16.1 K2.NO K4.NO K11.NO K12.NO R58.2 U20.3 U20.4 | length 287.2
  Top Layer w0.254: 128.524,40.513 129.413,40.513 ; U20.3@131.699,14.097 131.826,13.97 131.941,13.97 U20.3@131.987,13.924
  Top Layer w1: R58.2@120.823,36.576 124.587,36.576 128.524,40.513 ; U20.4@130.556,12.827 U20.3@130.556,13.843 ; U20.4@131.987,13.081 U20.3@131.987,13.924
  Top Layer w2: D1.A@121.329,10.16 D1.A@121.412,10.077 ; D2.A@121.373,4.191 D2.A@121.412,4.23 ; 131.129,12.017 U20.4@131.129,12.827
  Top Layer w3: K11.NO@81.311,83.978 84.04,86.707 112.1,86.707 114.077,84.73 K12.NO@114.077,83.851 ; D1.A@121.329,10.16 129.272,10.16 131.129,12.017 ; D2.A@121.373,4.191 122.008,3.556 145.513,3.556 145.894,3.937 147.066,5.109 147.066,29.718 146.431,30.353 J16.1@142.113,30.353 ; D2.A@121.412,4.23 D1.A@121.412,10.077 ; 129.413,40.513 129.413,41.181 ; v7(131.445,45.466) 131.17,45.466 129.413,43.709 129.413,41.181 ; J16.1@141.986,30.48 140.114,30.48 129.413,41.181
  Bottom Layer w0.254: 18.288,86.995 18.669,86.995 ; J16.1@141.732,30.353 141.732,30.861 141.986,31.115 J16.1@141.986,30.48
  Bottom Layer w2: 139.025,30.861 140.843,30.861
  Bottom Layer w3: K2.NO@15.144,83.851 18.288,86.995 18.542,87.249 73.025,87.249 75.311,84.963 80.326,84.963 K11.NO@81.311,83.978 ; 64.77,86.695 64.77,84.009 K4.NO@64.801,83.978 ; K12.NO@114.077,83.851 114.077,81.503 118.237,77.343 136.549,77.343 136.597,77.391 139.293,77.391 139.341,77.343 139.975,77.343 141.859,75.459 141.859,57.277 138.43,53.848 138.43,52.451 v7(131.445,45.466)
VCC1: F1.2_1 F1.2_2 U20.1 U20.2 | length 44.2
  Top Layer w0.254: 123.571,15.367 123.063,15.875 123.825,16.637
  Top Layer w1: 123.571,15.367 127.083,15.367 127.132,15.416 U20.2@131.08,15.416
  Top Layer w2: F1.2_2@98.486,22.352 99.06,22.352 99.187,22.479 99.314,22.352 F1.2_1@106.106,22.352 117.221,22.352 123.38,16.192 ; 123.825,16.637 U20.1@131.129,16.637
VIN: F1.1_1 F1.1_2 J18.1 K17.COM | length 57.4
  Top Layer w4: F1.1_2@125.796,22.352 126.431,21.717 132.781,21.717 F1.1_1@133.416,22.352 134.686,21.082 140.462,21.082 J18.1@141.986,19.558
  Bottom Layer w3: 113.898,47.012 112.141,45.254 112.141,32.004 121.793,22.352 F1.1_2@125.796,22.352 ; 113.92,46.99 K17.COM@120.07,46.99
pads on no net: K1.NC K2.NC K3.NC K4.NC K9.NC K10.NC K11.NC K12.NC K17.NC U17. U17.12 U17.13 U17.16 U17.30 U18.9 U.9
copper on no net:
  other v6: 151.638,3.429 3.937,3.937 3.429,106.553 151.511,106.553

## Polygon pours and split planes (outlines as drawn)
GND on Bottom Layer "GND_L02_P001" (solid, pour order 1): 0,-0.127 116.84,-0.127 116.84,63.119 114.935,65.024 0.127,65.024
GND on Top Layer "GND_L01_P000" (solid, pour order 0): 0,-0.127 116.84,-0.127 116.84,64.77 0,64.77 -0.127,64.897

## Keep-outs
Keep-Out Layer:
  lines w0.254: 155.067,110.109 155.067,0 0,0 0,110.109 155.067,110.109 ; 155.067,110.109 155.067,110.109

## Other copper
Top Layer:
  region net GND: 235 vertices and 0 holes, not listed, extent 120.783,57.744 127.136,62.215
  region net GND: 122.412,58.794 122.412,60.314 123.136,60.314 123.136,60.296 123.263,60.296 123.263,60.278 123.354,60.278 123.354,60.26 123.408,60.26 123.408,60.242 123.462,60.242 123.462,60.224 123.516,60.224 123.516,60.206 123.553,60.206 123.553,60.188 123.589,60.188 123.589,60.169 123.625,60.169 123.625,60.151 123.643,60.151 123.643,60.133 123.679,60.133 123.679,60.115 123.697,60.115 123.697,60.097 123.734,60.097 123.734,60.079 123.752,60.079 123.752,60.061 123.77,60.061 123.77,60.043 123.788,60.043 123.788,60.025 123.806,60.025 123.806,60.007 123.824,60.007 123.824,59.988 123.842,59.988 123.842,59.952 123.86,59.952 123.86,59.934 123.878,59.934 123.878,59.916 123.896,59.916 123.896,59.88 123.915,59.88 123.915,59.862 123.933,59.862 123.933,59.826 123.951,59.826 123.951,59.789 123.969,59.789 123.969,59.753 123.987,59.753 123.987,59.699 124.005,59.699 124.005,59.663 124.023,59.663 124.023,59.608 124.041,59.608 124.041,59.536 124.059,59.536 124.059,59.446 124.077,59.446 124.077,59.337 124.096,59.337 124.096,58.758 124.077,58.758 124.077,58.631 124.059,58.631 124.059,58.541 124.041,58.541 124.041,58.486 124.023,58.486 124.023,58.414 124.005,58.414 124.005,58.378 123.987,58.378 123.987,58.323 123.969,58.323 123.969,58.287 123.951,58.287 123.951,58.251 123.933,58.251 123.933,58.233 123.915,58.233 123.915,58.197 123.896,58.197 123.896,58.16 123.878,58.16 123.878,58.142 123.86,58.142 123.86,58.124 123.842,58.124 123.842,58.088 123.824,58.088 123.824,58.07 123.806,58.07 123.806,58.052 123.788,58.052 123.788,58.034 123.77,58.034 123.77,58.016 123.752,58.016 123.752,57.998 123.715,57.998 123.715,57.979 123.697,57.979 123.697,57.961 123.661,57.961 123.661,57.943 123.643,57.943 123.643,57.925 123.607,57.925 123.607,57.907 123.571,57.907 123.571,57.889 123.534,57.889 123.534,57.871 123.498,57.871 123.498,57.853 123.444,57.853 123.444,57.835 123.39,57.835 123.39,57.817 123.335,57.817 123.335,57.798 123.245,57.798 123.245,57.78 123.082,57.78 123.082,57.762 122.412,57.762 122.412,58.776
  region net GND: 121.471,59.446 121.598,59.446 121.598,58.522 120.783,58.522 120.783,59.446 121.453,59.446
  region net GND: 235 vertices and 0 holes, not listed, extent 120.783,55.88 127.136,57.853
  text "Deep logic" at 120.261,55.014 h1.52 r90
  text "IOT front seat controller" at 118.093,48.006 h1.52 r90
  text "IOT front seat controller" at 166.06,46.274 h1.52 r90
  text "Deep logic" at 158.996,44.854 h1.52 r90

## Silkscreen, mask and mechanical layers (free items; w line width, h text height)
Top Solder:
  region: 116.967,47.879 116.967,62.357 127.381,62.357 127.381,55.499 118.618,55.499 118.618,47.879

## Text inside footprints (layer, text, board x,y; h text height)
C1: Top Overlay "+" at 97.879,6.616 h1.5
C2: Top Overlay "+" at 80.022,1.308 h1.5 r270
c5: Top Overlay "+" at 64.875,19.697 h1.5
C9: Top Overlay "+" at 47.256,0.911 h1.5 r270